# Altium PCB nrf_400708.PcbDoc (part 4 of 6)
Units mm, origin at the board's own origin, x right, y up, seen from the top; angles counter-clockwise.
Board outline 117 x 63.5 mm, 4 copper layers (Top Layer, Mid-Layer 1, Mid-Layer 2, Bottom Layer), stack 1.556 mm thick; 226 components, 168 nets, 912 pads, 2002 vias.
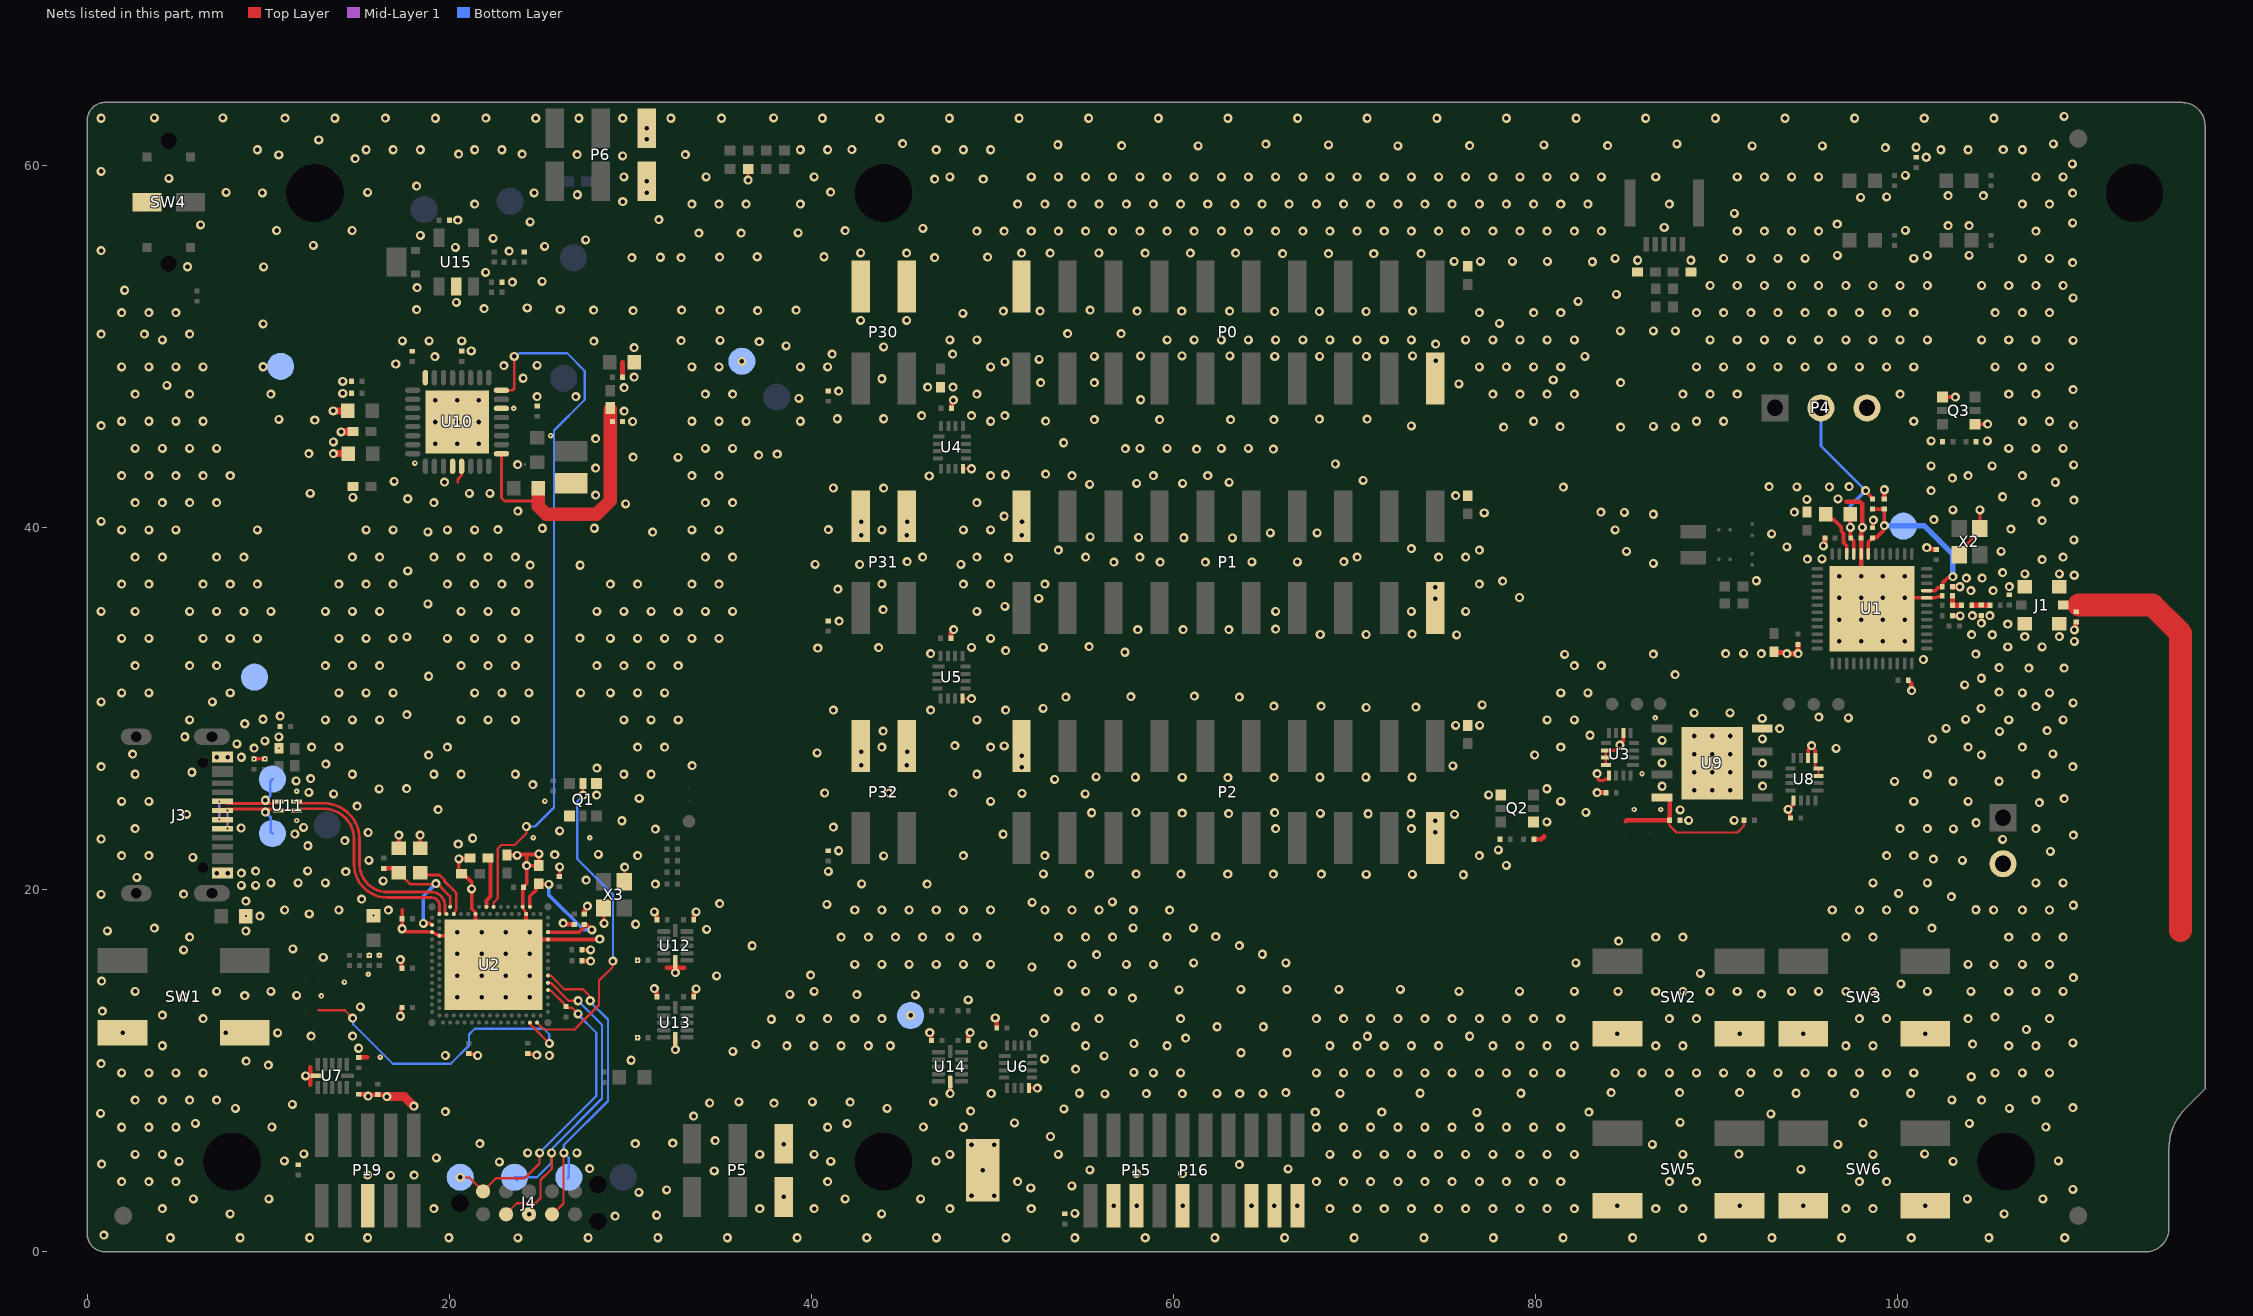
[diagram p4: the nets of this part, all layers, seen from the top]

## Via types
v1: diameter 0.5, hole 0.25, Top Layer to Bottom Layer, tented both sides, 1905 vias
v2: diameter 0.3, hole 0.1, Top Layer to Mid-Layer 1, tented top, 77 vias
v3: diameter 0.3, hole 0.1, Top Layer to Mid-Layer 1, tented both sides, 20 vias

## Nets (pads, with @x,y where several pads share a name; then routed paths per layer and width w, separated by ;. In a path a pad name is that pad's centre, name@x,y a point inside that pad or via, vN(x,y) a via of type N, cw(c..) or ccw(c..) an arc to the next point about the centre after c; other vN are vias at no path point) (continued)
GND: (continued)
  Top Layer w0.25: v1(12.075,9.725) U7.6@12.7,9.725 ; 12.34,9.244 12.34,10.2 ; C14.2@15.004,8.707 15.014,8.697 15.36,8.697 15.457,8.6 v1(15.525,8.6) 15.593,8.6 15.675,8.682 16.054,8.682 R18.1@16.064,8.692 16.074,8.682 16.391,8.682 16.493,8.58 v1(16.56,8.58) ; C53.1@15.004,10.744 15.468,10.744 ; v1(26.299,18.167) 26.367,18.167 26.433,18.101 26.899,18.101 C36.2@26.909,18.091 ; v1(31.346,14.539) 31.346,14.471 31.471,14.346 31.471,14.114 C76.2@31.481,14.104 ; v1(31.346,18.789) 31.346,18.721 31.471,18.596 31.471,18.364 C74.2@31.481,18.354 ; 32.025,15.69 32.981,15.69 ; v1(32.5,11.175) U13.6@32.5,11.8 ; v1(32.5,15.425) U12.6@32.5,16.05 ; C77.2@33.518,14.094 33.528,14.104 33.528,14.341 33.653,14.466 v1(33.653,14.533) ; C75.2@33.518,18.354 33.528,18.364 33.528,18.596 33.653,18.721 v1(33.653,18.789) ; v1(46.555,12.114) 46.555,12.046 46.644,11.957 46.644,11.689 C78.2@46.654,11.679 ; v1(47.675,8.75) U14.6@47.675,9.375 ; C15.2@47.718,33.903 47.728,33.913 47.728,34.168 47.868,34.307 v1(47.868,34.375) ; C10.2@47.752,46.607 47.762,46.617 47.762,46.894 47.856,46.989 v1(47.856,47.056) ; C79.2@48.68,11.679 48.69,11.689 48.69,11.956 48.78,12.046 v1(48.78,12.114) ; v1(50.172,12.931) 50.172,12.864 50.245,12.79 50.245,12.379 C49.2@50.255,12.369 ; v1@95.915,39.068 v1@95.915,39.073 ; 97.195,41.453 97.938,41.453 98.074,41.317 v1(98.074,40.022) 98.074,39.954 98.015,39.895 98.015,39.449 C1.1@98.005,39.439 U1.44@98.005,38.555 v1(98.005,37.33) ; C2.1@99.294,41.602 v1(99.294,42.104) ; C8.2@100.61,31.575 100.61,31.56 100.62,31.55 100.624,31.55 100.77,31.404 100.77,31.027 v1(100.792,31.005) ; v1(101.63,38.904) 101.698,38.904 101.784,38.818 102.154,38.818 C4.2@102.164,38.808 ; C60.2@103.058,35.149 103.063,35.144 103.466,35.144 v1(103.471,35.139) ; v1(109.789,34.36) 109.789,34.427 109.855,34.493 109.855,34.785 109.865,34.795 C38.1@109.88,34.795
  Top Layer w0.254: X3.4@28.531,18.994 X3.4@28.534,18.99 ; X3.2@29.677,20.448 X3.2@29.681,20.444
  Top Layer w0.27: C25.1@29.59,48.321 29.59,49.147 ; R10.2@79.925,22.798 80.344,22.798 80.488,22.942 ; v1(83.425,25.375) 83.429,25.371 83.908,25.371 C65.2@83.908,25.365 ; C19.1@85.652,54.123 C19.1@85.654,54.124 ; v1@85.654,54.779 v1(85.656,54.781) ; v1(95.915,39.006) 95.915,39.068 96,39.153 C11.2@96,39.439
  Top Layer w0.3: C41.1@93.186,33.155 93.23,33.112 93.798,33.112 93.855,33.055 v1(93.909,33.055) v1(94.53,33.055) 94.518,33.067 C7.2@94.518,33.564 ; C5.1@103.084,36.75 103.454,36.75 v1(103.459,36.745)
  Top Layer w0.4: v1(13.6,46.456) 14.401,46.456 C26.1@14.404,46.459 ; v1@13.61,44.1 C54.2@14.425,44.1 ; v1(14.032,45.304) 14.037,45.308 14.679,45.308 C23.1@14.684,45.313 ; v1(90.775,28.5) U9.9@90.975,28.5 ; U9.4@92.545,28.905 U9.4@92.547,28.903 ; v1@92.547,28.344 v1(92.549,28.341)
  Top Layer w0.5: v1(16.56,8.58) 17.53,8.58 v1(18.055,8.055)
  other v1: 4.604,0.78 8.451,0.78 12.298,0.78 15.498,0.78 19.991,0.78 23.8,0.775 27.685,0.78 31.532,0.78 35.379,0.78 39.225,0.78 43.072,0.78 46.919,0.78 50.766,0.78 54.575,0.78 58.459,0.78 62.306,0.78 66.153,0.78 70,0.78 73.847,0.78 77.693,0.78 81.54,0.78 85.387,0.78 89.234,0.78 93.081,0.78 96.927,0.78 100.774,0.78 105.063,0.78 109.254,0.78 0.929,0.925 29.175,1.975 31.471,2.025 24.418,2.074 7.9,2.1 43.9,2.1 105.9,2.1 54.575,2.125 4.162,2.387 19.162,2.387 37.162,2.387 40.162,2.387 47.662,2.387 52.162,2.387 68.662,2.387 70.162,2.387 71.662,2.387 73.162,2.387 74.662,2.387 76.162,2.387 77.662,2.387 79.162,2.387 80.662,2.387 82.162,2.387 86.662,2.387 88.162,2.387 97.162,2.387 98.662,2.387 56.708,2.553 57.978,2.553 60.518,2.553 64.328,2.55 65.598,2.55 66.868,2.55 84.543,2.561 91.293,2.561 94.804,2.561 101.554,2.561 5.875,2.925 10.046,2.925 41.875,2.925 46.046,2.925 103.875,2.925 108.046,2.925 38.5,3.04 48.86,3.097 50.124,3.097 30.488,3.282 32.023,3.426 109.704,3.458 52.134,3.531 54.4,3.65 1.912,3.887 3.412,3.887 4.912,3.887 40.912,3.887 51.412,3.887 67.912,3.887 69.412,3.887 70.912,3.887 72.412,3.887 73.912,3.887 75.412,3.887 76.912,3.887 78.412,3.887 79.912,3.887 81.412,3.887 87.412,3.887 88.912,3.887 97.912,3.887 99.412,3.887 16.766,4.224 15.498,4.244 18.07,4.246 57.978,4.32 60.525,4.32 34.65,4.473 49.475,4.5 55.403,4.531 94.677,4.558 27.763,4.596 66.356,4.589 0.804,4.85 63.655,4.826 22.784,4.973 5.084,5 41.084,5 103.084,5 10.905,5.025 46.905,5.025 108.905,5.025 19.296,5.197 2.662,5.387 4.162,5.387 37.162,5.387 40.162,5.387 47.662,5.387 53.662,5.387 68.662,5.387 70.162,5.387 71.662,5.387 73.162,5.387 74.662,5.387 76.162,5.387 77.662,5.387 79.162,5.387 80.662,5.387 82.162,5.387 88.162,5.387 91.25,5.4 98.662,5.387 11.982,5.412 101.518,5.411 24.343,5.475 27.058,5.475 48.86,5.922 50.125,5.922 86.474,5.941 96.721,5.941 38.5,5.945 21.707,5.978 30.285,5.979 32.356,6.013 34.7,6.15 53.225,6.375 1.912,6.887 3.412,6.887 4.912,6.887 10.208,6.9 40.912,6.887 46.208,6.9 48.412,6.887 67.912,6.887 69.412,6.887 70.912,6.887 72.412,6.887 73.912,6.887 75.412,6.887 76.912,6.887 78.412,6.887 79.912,6.887 81.412,6.887 108.208,6.9 5.99,7.1 41.99,7.1 103.99,7.1 51.236,7.125 98.114,7.125 88.004,7.15 33.514,7.5 93.025,7.627 0.75,7.65 67.85,7.72 76.775,7.706 71.525,7.722 82.963,7.722 19.793,7.752 48.81,7.772 53.969,7.9 8.2,7.925 44.2,7.925 106.2,7.925 109.704,7.975 11.343,8.151 34.393,8.225 37.95,8.213 42.149,8.275 36.015,8.282 40.066,8.282 46.754,8.282 2.662,8.387 4.162,8.387 5.662,8.387 7.162,8.387 103.025,8.4 104.662,8.387 107.662,8.387 56.225,8.725 49.951,8.75 58.517,8.747 60.515,8.747 62.419,8.756 63.68,8.747 64.959,8.76 69.225,8.756 54.822,8.763 73.64,8.763 79.213,8.763 94.409,8.763 97.65,8.763 100.735,8.763 66.229,8.798 84.193,8.798 87.974,8.798 91.293,8.798 104.09,9.675 1.912,9.887 3.412,9.887 4.912,9.887 6.412,9.887 58.912,9.887 60.412,9.887 67.912,9.887 69.412,9.887 70.912,9.887 72.412,9.887 73.912,9.887 75.412,9.887 76.912,9.887 78.412,9.887 79.912,9.887 81.412,9.887 84.412,9.887 85.912,9.887 87.412,9.887 88.912,9.887 90.412,9.887 91.912,9.887 93.412,9.887 94.912,9.887 96.412,9.887 97.912,9.887 99.412,9.887 100.912,9.887 105.412,9.887 106.912,9.887 108.412,9.887 57.825,9.915 54.61,10.1 10.015,10.313 0.78,10.4 8.794,10.535 30.058,10.588 52.9,10.666 56.185,10.825 19.8,10.85 25.54,10.85 63.748,11.002 66.297,11.002 35.675,11.075 15.004,11.25 4.162,11.387 38.662,11.387 40.162,11.387 41.662,11.387 43.162,11.387 44.375,11.389 55.162,11.387 59.662,11.387 68.662,11.387 70.162,11.387 71.662,11.387 73.162,11.387 74.662,11.387 77.662,11.387 79.162,11.387 80.662,11.387 82.162,11.387 86.662,11.387 88.162,11.387 97.162,11.387 98.662,11.387 106.162,11.387 107.662,11.387 49.504,11.435 36.95,11.458 104.16,11.475 57.825,11.513 109.704,11.55 60.688,11.814 12.375,11.925 14.675,11.925 70.725,11.913 76.377,11.913 84.543,12.058 91.293,12.058 94.804,12.061 101.554,12.061 52.282,12.088 1.963,12.097 7.65,12.097 10.529,12.102 107.135,12.286 54.61,12.438 62.432,12.438 64.982,12.438 37.8,12.851 6.412,12.887 39.412,12.887 40.912,12.887 42.412,12.887 43.912,12.887 52.912,12.887 55.912,12.887 60.412,12.887 67.912,12.887 69.412,12.887 70.912,12.887 72.412,12.887 73.912,12.887 75.412,12.887 76.912,12.887 78.412,12.887 79.912,12.887 81.412,12.887 87.412,12.887 88.912,12.887 97.912,12.887 99.412,12.887 103.912,12.887 108.412,12.887 105.406,12.975 4.162,13.078 45.5,13.064 0.852,13.3 15.1,13.535 48.68,13.928 57.748,14.025 20.46,14.064 21.794,14.064 23.127,14.064 24.46,14.064 5.335,14.1 8.713,14.152 11.579,14.167 38.825,14.221 42.533,14.208 45.762,14.2 92.496,14.239 2.662,14.387 7.162,14.387 10.162,14.387 40.162,14.387 53.662,14.387 55.162,14.387 56.662,14.387 75.791,14.393 79.134,14.393 82.162,14.387 84.575,14.393 86.662,14.387 88.162,14.387 89.662,14.387 91.162,14.387 94.162,14.387 95.662,14.387 97.162,14.387 98.662,14.387 101.662,14.387 104.068,14.393 106.162,14.387 107.662,14.387 109.162,14.387 60.325,14.475 63.741,14.5 66.288,14.5 69.15,14.5 72.55,14.5 100.205,14.806 0.804,14.954 109.729,15.15 20.46,15.264 21.794,15.264 23.127,15.264 24.46,15.264 34.775,15.247 39.977,15.285 89.122,15.387 52.199,15.738 42.412,15.887 43.912,15.887 45.412,15.887 46.912,15.887 48.412,15.887 49.912,15.887 54.412,15.887 57.412,15.887 58.912,15.887 103.912,15.887 105.35,15.887 106.912,15.887 108.412,15.887 61.126,15.963 66.229,15.963 82.25,15.963 13.05,16.275 55.777,16.419 64.925,16.443 20.46,16.464 21.794,16.464 23.127,16.464 24.46,16.464 5.335,16.687 11.375,16.744 36.744,16.913 63.655,16.924 84.613,17.172 5.662,17.387 41.662,17.387 43.162,17.387 44.662,17.387 46.162,17.387 47.662,17.387 49.162,17.387 53.662,17.387 55.162,17.387 56.662,17.387 59.662,17.387 86.662,17.387 88.162,17.387 97.162,17.387 98.662,17.387 106.162,17.387 107.662,17.387 109.162,17.387 62.354,17.411 20.46,17.664 21.794,17.664 23.127,17.664 24.46,17.664 8.771,17.727 1.125,17.732 34.233,17.812 3.725,17.886 57.788,17.894 61.115,17.903 101.913,17.887 30.306,18.101 9.548,18.552 12.275,18.672 10.912,18.887 13.912,18.887 16.65,18.879 42.412,18.887 43.912,18.887 45.412,18.887 46.912,18.887 48.412,18.887 49.912,18.887 52.912,18.887 54.412,18.887 55.912,18.887 57.8,18.875 59.8,18.875 96.412,18.887 97.912,18.887 99.412,18.887 100.912,18.887 105.324,18.887 106.912,18.887 108.412,18.887 104.351,18.9 109.729,19.15 40.875,19.199 34.95,19.235 52.205,19.313 56.649,19.339 8.775,19.375 15.169,19.491 102.993,19.625 0.78,19.754 5.335,19.769 100.076,19.8 8.529,20.25 9.318,20.25 31.398,20.313 46.404,20.317 42.786,20.325 10.162,20.387 11.662,20.387 13.162,20.387 98.662,20.387 101.662,20.387 107.662,20.387 109.162,20.387 16.361,20.49 27.575,20.535 2.755,20.685 70.667,20.85 73.213,20.85 76.033,20.835 55.389,20.869 57.95,20.875 60.427,20.875 63.015,20.875 65.534,20.875 68.188,20.875 52.829,20.88 7.168,20.921 7.779,20.925 8.529,20.925 14.292,21.012 40.95,21.018 9.318,21.041 12.19,21.05 78.405,21.35 15.575,21.625 103.604,21.625 101.998,21.7 5.845,21.797 1.912,21.887 3.412,21.887 30.412,21.887 44.004,21.881 48.412,21.887 52.912,21.887 76.912,21.887 99.412,21.887 100.912,21.887 25.837,21.948 28.251,21.959 108.457,22.13 41.525,22.16 77.967,22.21 12.196,22.436 20.506,22.531 14.242,22.718 105.817,22.792 0.78,22.81 21.3,22.85 109.729,23.025 11.479,23.085 50.602,23.071 15.525,23.169 74.484,23.177 26.11,23.254 31.398,23.354 103.107,23.367 2.662,23.387 65.662,23.387 73.162,23.387 100.162,23.387 101.662,23.387 107.662,23.387 8.517,23.417 11.966,23.455 41.225,23.461 104.354,23.708 80.648,23.76 29.542,23.819 74.484,23.828 88.472,23.835 90.988,23.835 5.5,24.175 75.542,24.165 70.775,24.203 73.129,24.203 63.07,24.211 68.139,24.223 60.503,24.244 55.494,24.26 57.937,24.274 65.601,24.265 82.805,24.286 19.394,24.429 88.004,24.415 14.925,24.625 107.854,24.825 1.912,24.887 3.412,24.887 49.912,24.887 81.412,24.887 100.912,24.887 103.912,24.887 109.224,25.035 30.506,25.048 28.15,25.234 77.425,25.25 55.14,25.297 13.625,25.3 47.839,25.343 51.65,25.332 40.75,25.35 44.3,25.35 12.26,25.387 88.775,25.5 89.775,25.5 90.775,25.5 16.13,25.583 17.651,25.59 80.65,25.585 87.013,25.724 92.564,25.734 24.634,25.81 99.85,25.996 103.084,26 105.625,26 11.55,26.025 53.45,26.098 12.347,26.15 63.02,26.205 65.582,26.198 57.911,26.22 60.503,26.213 68.103,26.22 70.644,26.22 73.2,26.22 55.743,26.242 2.662,26.387 14.662,26.387 19.162,26.387 20.662,26.387 23.662,26.387 29.662,26.387 31.162,26.387 49.162,26.387 101.662,26.387 107.662,26.387 5.796,26.498 88.775,26.5 89.775,26.5 90.775,26.5 28.164,26.72 51.649,26.785 0.78,26.804 109.71,26.805 33.425,26.865 75.45,26.852 42.759,26.888 45.284,26.885 13.197,26.95 87.013,27.009 92.556,27 7.171,27.325 7.779,27.325 8.529,27.325 51.649,27.41 18.869,27.441 79.969,27.45 104.646,27.45 2.517,27.497 88.775,27.5 89.775,27.5 90.775,27.5 108.599,27.516 40.329,27.561 42.759,27.622 45.299,27.622 96.624,27.812 9.225,27.825 12.412,27.887 13.912,27.887 19.912,27.887 30.412,27.887 31.912,27.887 43.912,27.887 49.912,27.887 81.412,27.887 103.912,27.887 106.912,27.887 50.668,27.95 47.946,27.974 8.283,28.065 9.824,28.225 87.01,28.26 101.946,28.341 5.4,28.459 10.596,28.452 88.775,28.5 89.775,28.5 83.028,28.54 105.65,28.75 43.975,28.775 108.279,28.8 93.503,28.905 102.699,28.924 75.605,29.083 76.925,29.083 8.713,29.175 5.662,29.387 13.162,29.387 14.662,29.387 16.162,29.387 20.662,29.387 22.162,29.387 23.662,29.387 29.662,29.387 31.162,29.387 32.662,29.387 49.162,29.387 80.662,29.387 82.162,29.387 106.162,29.387 109.162,29.387 9.721,29.425 103.78,29.414 92.545,29.475 97.305,29.502 95.667,29.542 10.662,29.6 17.664,29.675 88.775,29.78 90.762,29.78 41.233,29.935 46.6,29.925 50.748,29.935 104.635,30.02 52.812,30.025 70.662,30.073 73.404,30.1 107.658,30.128 65.57,30.15 68.178,30.15 77.072,30.222 109.718,30.329 0.78,30.387 6.919,30.387 54.076,30.647 63.655,30.645 57.663,30.676 61.175,30.699 1.912,30.887 3.412,30.887 7.912,30.887 13.912,30.887 15.412,30.887 16.912,30.887 21.412,30.887 22.912,30.887 24.412,30.887 27.262,30.887 28.912,30.887 30.412,30.887 31.912,30.887 81.412,30.887 82.912,30.887 106.912,30.887 108.412,30.887 105.625,30.925 103.725,31.325 104.653,31.689 18.869,31.8 87.73,31.896 107.279,32.248 109.224,32.252 105.625,32.275 2.662,32.387 5.662,32.387 7.162,32.387 13.162,32.387 14.662,32.387 16.162,32.387 20.662,32.387 22.162,32.387 23.662,32.387 28.162,32.387 29.662,32.387 31.162,32.387 32.662,32.387 82.162,32.387 83.662,32.387 101.45,32.725 81.625,33.005 86.525,33.025 104.344,33.025 46.6,33.05 90.525,33.05 91.513,33.063 92.5,33.05 57.329,33.125 50.748,33.216 40.365,33.355 43.73,33.383 48.86,33.399 52.823,33.399 106.107,33.42 108.005,33.42 55.353,33.438 96.805,33.73 98.005,33.73 99.205,33.73 100.405,33.73 109.788,33.73 1.912,33.887 3.412,33.887 6.412,33.887 7.912,33.887 9.412,33.887 13.912,33.887 15.412,33.887 16.912,33.887 19.912,33.887 21.412,33.887 22.912,33.887 24.412,33.887 27.223,33.903 28.912,33.887 30.412,33.887 31.912,33.887 33.412,33.887 34.912,33.887 49.912,33.887 17.664,33.975 107.045,33.989 108.955,33.989 75.657,34.081 68.125,34.106 70.662,34.106 104.115,34.105 105.25,34.093 73.204,34.127 58.043,34.375 60.552,34.375 63.079,34.375 65.657,34.406 106.107,34.685 104.646,34.736 41.55,34.85 96.805,34.93 98.005,34.93 99.205,34.93 100.405,34.93 104.149,35.154 105.121,35.154 0.78,35.387 2.662,35.387 5.662,35.387 7.162,35.387 8.662,35.387 10.162,35.387 13.162,35.387 14.662,35.387 16.162,35.387 20.662,35.387 22.162,35.387 23.662,35.387 28.162,35.387 29.662,35.387 31.162,35.387 32.662,35.387 34.162,35.387 35.662,35.387 49.162,35.387 65.662,35.387 73.162,35.387 76.162,35.387 43.975,35.478 50.707,35.655 18.832,35.798 74.475,36.074 52.575,36.1 96.805,36.13 98.005,36.13 99.205,36.13 100.405,36.13 79.134,36.15 104.068,36.525 105.3,36.525 41.478,36.617 74.475,36.725 106.2,36.755 1.912,36.887 3.412,36.887 6.412,36.887 7.912,36.887 9.412,36.887 13.912,36.887 15.412,36.887 16.912,36.887 19.912,36.887 21.412,36.887 22.912,36.887 24.412,36.887 28.912,36.887 30.412,36.887 33.412,36.887 34.912,36.887 43.912,36.887 48.412,36.887 49.912,36.887 52.912,36.887 76.912,36.887 78.2,37.052 92.225,37.075 103.825,37.225 104.695,37.225 96.805,37.33 99.205,37.33 100.405,37.33 109.78,37.38 107.055,37.456 108.955,37.456 105.826,37.524 17.717,37.622 24.479,37.936 27.24,37.931 40.225,37.975 42.681,37.973 48.278,37.975 86.525,38.04 56.729,38.107 59.275,38.1 61.775,38.1 64.352,38.115 66.864,38.115 45.299,38.127 69.429,38.127 108.005,38.238 95.041,38.273 95.845,38.28 50.905,38.347 2.662,38.387 4.162,38.387 7.162,38.387 8.662,38.387 14.662,38.387 16.162,38.387 19.162,38.387 20.662,38.387 22.162,38.387 23.662,38.387 34.162,38.387 35.662,38.387 46.162,38.387 49.162,38.387 55.162,38.387 58.162,38.387 70.162,38.387 74.662,38.387 76.162,38.387 109.162,38.387 85.044,38.7 105.741,38.7 53.656,38.764 76.917,38.764 73.162,38.846 93.9,38.944 109.76,39.33 60.594,39.451 63.274,39.45 55.417,39.494 58.092,39.476 42.759,39.588 45.284,39.585 51.629,39.585 93.057,39.665 65.374,39.716 67.95,39.721 31.243,39.759 18.832,39.777 1.912,39.887 3.412,39.887 4.912,39.887 9.412,39.887 15.412,39.887 16.912,39.887 19.912,39.887 21.412,39.887 22.692,39.9 33.412,39.887 34.912,39.887 40.951,39.9 43.912,39.887 48.412,39.887 49.912,39.887 84.412,39.887 106.277,39.93 25.15,39.975 28.025,39.975 42.759,40.322 45.299,40.322 51.65,40.325 0.78,40.355 108.005,40.403 102.025,40.45 50.662,40.64 86.525,40.75 77.187,40.83 83.625,40.867 84.929,40.855 94.317,40.867 23.803,40.927 103.073,40.987 29.75,41.325 2.662,41.387 4.162,41.387 5.662,41.387 7.162,41.387 19.162,41.387 34.162,41.387 35.662,41.387 49.162,41.387 107.662,41.387 109.76,41.53 95.005,41.571 96.728,41.596 17.717,41.605 14.684,41.686 105.826,41.717 75.605,41.781 28.1,41.807 12.33,41.907 21.125,41.9 22.25,41.9 101.876,42.05 41.225,42.2 44.004,42.193 81.558,42.249 94.459,42.258 96.25,42.255 92.925,42.275 97.341,42.278 55.389,42.404 57.985,42.45 60.526,42.45 63.086,42.505 108.736,42.517 19.748,42.521 16.963,42.57 70.5,42.615 103.05,42.75 46.525,42.863 1.912,42.887 3.412,42.887 4.912,42.887 6.412,42.887 7.912,42.887 33.412,42.887 34.912,42.887 49.912,42.887 54.412,42.887 58.912,42.887 61.912,42.887 103.912,42.887 106.912,42.887 50.748,42.931 52.95,42.961 28.1,43.3 101.875,43.425 105.236,43.42 109.739,43.48 23.792,43.496 68.959,43.525 30.17,43.906 32.653,43.895 37.1,44.02 38.128,44.067 12.258,44.1 13.61,44.096 61.3,44.347 65.534,44.347 57.363,44.371 2.662,44.387 4.162,44.387 5.662,44.387 7.162,44.387 34.162,44.387 35.662,44.387 58.162,44.387 59.662,44.387 62.662,44.387 64.162,44.387 106.162,44.387 107.662,44.387 109.162,44.387 19.242,44.646 20.442,44.646 21.642,44.646 53.95,44.7 13.61,44.746 101.875,44.8 104.986,44.8 28.1,44.927 78.252,45.563 84.725,45.563 81.375,45.592 87.75,45.575 86.525,45.6 73.162,45.634 0.78,45.647 109.739,45.68 104.993,45.725 19.242,45.846 20.442,45.846 21.642,45.846 1.912,45.887 3.412,45.887 4.912,45.887 6.412,45.887 30.139,45.874 33.412,45.887 34.912,45.887 36.412,45.887 39.412,45.887 49.912,45.887 52.95,45.889 79.912,45.887 88.912,45.887 90.412,45.887 100.912,45.887 106.912,45.887 108.412,45.887 12.58,45.946 10.6,45.988 55.65,45.975 59.248,45.975 63.175,45.975 65.57,45.975 68.075,46 70.719,46 41.45,46.026 44.004,46.026 46.1,46.2 48.86,46.2 50.707,46.201 29.675,46.45 19.242,47.046 20.442,47.046 21.642,47.046 58.2,47.075 39.328,47.15 24.867,47.246 27,47.25 2.662,47.387 5.662,47.387 10.162,47.387 34.162,47.387 35.662,47.387 49.162,47.387 77.662,47.387 79.162,47.387 80.662,47.387 82.162,47.387 88.162,47.387 89.662,47.387 91.162,47.387 100.162,47.387 106.162,47.387 107.662,47.387 14.125,47.425 41.525,47.549 109.718,47.63 29.675,47.75 46.439,47.769 47.839,47.769 4.412,47.871 75.779,47.949 52.677,48.025 55.65,48.025 84.725,48.025 14.125,48.091 80.998,48.175 43.906,48.234 24.087,48.264 30.225,48.329 1.912,48.887 3.412,48.887 4.912,48.887 6.412,48.887 33.412,48.887 34.912,48.887 39.412,48.887 40.912,48.887 49.912,48.887 76.912,48.887 78.412,48.887 79.912,48.887 81.412,48.887 88.912,48.887 90.412,48.887 91.912,48.887 93.412,48.887 94.912,48.887 96.412,48.887 97.912,48.887 99.412,48.887 100.912,48.887 105.412,48.887 106.912,48.887 108.412,48.887 9.725,48.898 23.025,48.955 24.867,48.975 17.055,49.05 50.707,49.164 36.174,49.2 74.504,49.225 52.6,49.308 19.217,49.455 55.65,49.475 65.613,49.475 68.088,49.475 70.675,49.475 82.75,49.475 58.2,49.5 60.488,49.5 63.138,49.5 73.231,49.5 41.157,49.598 47.819,49.6 21.225,49.775 30.225,49.949 44.004,49.997 38.625,50.048 74.5,50.15 37.135,50.287 28.001,50.31 17.425,50.332 18.9,50.325 20.7,50.325 32.824,50.343 34.975,50.35 109.713,50.35 4.162,50.387 47.662,50.387 49.162,50.387 59.662,50.387 61.162,50.387 62.662,50.387 64.162,50.387 65.662,50.387 67.162,50.387 68.662,50.387 70.162,50.387 71.662,50.387 73.162,50.387 76.162,50.387 77.662,50.387 79.162,50.387 80.662,50.387 82.162,50.387 89.662,50.387 91.162,50.387 92.662,50.387 94.162,50.387 95.662,50.387 97.162,50.387 98.662,50.387 100.162,50.387 101.662,50.387 104.662,50.387 106.162,50.387 107.662,50.387 0.775,50.7 3.17,50.7 5.662,50.7 54.164,50.725 57.125,50.728 84.712,50.875 86.525,50.875 87.75,50.875 9.725,51.263 78.025,51.29 42.734,51.461 45.274,51.461 48.379,51.85 1.912,51.887 3.412,51.887 4.912,51.887 76.912,51.887 79.912,51.887 81.412,51.887 88.912,51.887 90.412,51.887 91.912,51.887 93.412,51.887 94.912,51.887 96.412,51.887 97.912,51.887 99.412,51.887 100.912,51.887 105.412,51.887 106.912,51.887 108.412,51.887 65.6,51.95 68.075,51.95 70.662,51.95 50.625,51.975 52.65,51.975 58.012,51.975 60.475,51.975 63.125,51.975 73.231,51.975 30.17,52.001 37.047,52.001 27.984,52.025 32.85,52.025 34.975,52.025 39.175,52.025 55.417,52.025 18.209,52.048 26.142,52.048 21.932,52.104 24.319,52.152 20.4,52.45 82.369,52.504 109.713,52.7 84.481,52.894 2.075,53.125 18.231,53.274 89.662,53.387 91.162,53.387 92.662,53.387 94.162,53.387 95.662,53.387 97.162,53.387 98.662,53.387 100.162,53.387 101.662,53.387 104.662,53.387 106.162,53.387 107.662,53.387 109.162,53.387 23.499,53.575 25.138,53.611 22.014,54.114 5.55,54.422 9.75,54.41 109.692,54.65 83.162,54.698 75.525,54.72 76.975,54.72 78.741,54.72 80.677,54.72 88.604,54.781 84.412,54.887 90.412,54.887 91.912,54.887 93.412,54.887 94.912,54.887 100.912,54.887 106.912,54.887 108.412,54.887 30.098,54.931 32.823,54.925 46.82,54.925 31.675,54.947 34.95,54.954 49.75,54.954 37.025,54.975 40.711,54.975 96.696,55.049 101.664,55.049 103.973,55.049 66.05,55.152 68.582,55.152 71.082,55.152 73.7,55.152 42.734,55.184 45.275,55.175 51.629,55.179 53.2,55.175 55.9,55.182 58.45,55.175 60.95,55.175 63.45,55.175 23.317,55.289 0.775,55.312 20.348,55.488 25.278,55.551 12.5,55.6 27.542,55.902 22.431,55.988 18.415,56.153 33.803,56.277 36.134,56.274 39.282,56.299 49.162,56.387 50.662,56.387 52.162,56.387 53.662,56.387 55.162,56.387 56.662,56.387 58.162,56.387 59.662,56.387 61.162,56.387 62.662,56.387 64.162,56.387 65.662,56.387 67.162,56.387 68.662,56.387 70.162,56.387 71.662,56.387 73.162,56.387 74.662,56.387 76.162,56.387 77.662,56.387 79.162,56.387 80.662,56.387 82.162,56.387 83.662,56.387 91.162,56.387 92.662,56.387 94.162,56.387 95.662,56.387 107.662,56.387 10.475,56.425 14.646,56.425 41.879,56.417 100.454,56.435 46.169,56.536 87.129,56.595 102.811,56.698 103.973,56.698 6.271,56.738 96.686,56.777 109.692,56.85 24.479,56.9 20.478,57 31.595,57.025 91.006,57.368 21.412,57.887 33.412,57.887 34.912,57.887 36.412,57.887 39.412,57.887 51.412,57.887 52.912,57.887 54.412,57.887 55.912,57.887 57.412,57.887 58.912,57.887 60.412,57.887 61.912,57.887 63.412,57.887 64.912,57.887 66.412,57.887 67.912,57.887 69.412,57.887 70.912,57.887 72.412,57.887 73.912,57.887 75.412,57.887 76.912,57.887 78.412,57.887 79.912,57.887 81.412,57.887 82.912,57.887 87.412,57.887 106.912,57.887 108.412,57.887 29.595,58.026 97.976,58.25 99.417,58.277 102.813,58.349 104.756,58.349 27.084,58.4 109.692,58.492 9.684,58.5 24.7,58.5 30.917,58.513 7.684,58.525 15.505,58.525 41.077,58.55 18.209,58.871 30.912,59.141 46.825,59.268 49.51,59.268 4.521,59.305 29.662,59.387 34.2,59.387 40.162,59.387 47.662,59.387 52.162,59.387 53.662,59.387 55.162,59.387 56.662,59.387 58.162,59.387 59.662,59.387 61.162,59.387 62.662,59.387 64.162,59.387 65.662,59.387 67.162,59.387 68.662,59.387 70.162,59.387 71.662,59.387 73.162,59.387 74.662,59.387 76.162,59.387 77.662,59.387 79.162,59.387 80.662,59.387 82.162,59.387 83.662,59.387 86.662,59.387 91.162,59.387 92.662,59.387 94.162,59.387 95.662,59.387 107.662,59.387 109.162,59.387 100.445,59.466 0.775,59.693 109.671,60.1 14.808,60.4 101.603,60.47 29.59,60.542 10.59,60.6 27.072,60.615 33.05,60.615 20.525,60.65 24.036,60.65 9.412,60.887 15.412,60.887 16.912,60.887 18.412,60.887 21.412,60.887 22.912,60.887 39.412,60.887 40.912,60.887 42.25,60.9 46.912,60.887 48.412,60.887 49.912,60.887 102.412,60.887 103.912,60.887 105.856,60.899 106.912,60.887 99.35,61 101.039,61.025 61.375,61.095 72.412,61.098 76.377,61.11 84,61.11 91.978,61.098 95.865,61.098 57.15,61.113 53.633,61.162 68.582,61.15 80.475,61.15 65.125,61.196 87.826,61.21 108.625,61.21 45.05,61.225 12.8,61.425 30.917,61.468 30.912,62.071 0.78,62.625 10.936,62.629 13.695,62.625 16.482,62.629 19.241,62.625 22.028,62.629 24.787,62.625 27.175,62.625 29.595,62.625 32.251,62.625 35.05,62.625 40.625,62.625 43.792,62.625 47.638,62.625 51.485,62.625 55.332,62.625 59.179,62.625 63.026,62.625 66.872,62.625 70.719,62.625 74.566,62.625 78.413,62.625 82.259,62.625 86.106,62.625 89.953,62.625 93.8,62.625 97.647,62.625 101.493,62.625 105.34,62.625 3.719,62.65 7.501,62.65 37.927,62.65 109.222,62.727
  other v2: 30.415,11.84 30.415,16.1 15.601,16.385 16.146,16.386 15.826,18.576 85.464,24.44 86.942,24.44 85.902,26.425 86.635,29.502
  other v3: 16.2,10.76 12.947,14.144 14.215,14.907 15.531,15.336 8.775,18.552 24.655,22.884 27.77,22.876 11.579,23.833 25.297,24.901 11.579,25.449 10.6,27.825 18.109,43.578 25.61,45.096 23.574,46.596
LED_PWR_CTRL: U2.A17 U10.8 | length 39.3
  Top Layer w0.125: U2.A17@22.46,19.064 22.46,19.287 22.692,19.519 22.692,22.288 22.88,22.475 23.63,22.475 24.275,23.12 v1(24.275,23.5)
  Top Layer w0.15: U10.8@22.892,47.596 23.49,47.596 23.604,47.71 23.604,49.471 v1(23.6,49.475)
  Bottom Layer w0.125: v1(23.6,49.475) 23.696,49.475 23.861,49.64 26.523,49.64 27.5,48.663 27.5,47.075 25.8,45.375 25.8,24.55 24.75,23.5 v1(24.275,23.5)
NetC6_2: C6.2 L2.2 L3.1 | length 0.9
  Top Layer w0.27: L2.2@103.058,35.73 C6.2@103.058,36.25
  Top Layer w0.3: L2.2@103.13,35.73 L3.1@103.5,35.73
NetC9_2: C9.2 L3.2 L4.1 | length 0.9
  Top Layer w0.3: L3.2@104.149,35.73 C9.2@104.635,35.73 L4.1@105.065,35.73
NetC21_1: C21.1 R39.2 SB9.2 SB10.2 U9.8 | length 9.1
  Top Layer w0.125: C21.1@87.422,23.842 87.422,23.553 87.801,23.174 91.174,23.174 91.537,23.537 R39.2@91.537,23.835
  Top Layer w0.25: 84.997,23.794 85.045,23.842 SB10.2@86.347,23.842 C21.1@87.422,23.842 87.422,24.995 87.322,25.095 U9.8@87.005,25.095
NetC27_2: C27.2 C57.2 FB3.1 L8.1 U10.1 | length 15.1
  Top Layer w0.15: U10.1@22.892,44.096 22.892,41.657 23.068,41.481 24.924,41.481
  Top Layer w0.75: C27.2@24.924,42.186 24.924,41.481 24.924,41.189 25.363,40.75 28.15,40.75 28.9,41.5 28.9,45.874 FB3.1@28.9,46.55
NetC32_2: C32.2 C33.1 U2.A27 U2.G31 | length 8.9
  Top Layer w0.15: C32.2@24.953,20.385 C32.2@25.032,20.306
  Top Layer w0.2: U2.A27@24.46,19.064 24.46,19.64 24.801,19.98 C32.2@24.801,20.381 ; C32.2@24.803,20.535 24.953,20.385 C32.2@24.953,20.34 ; C32.2@25.032,20.306 v1(25.512,20.306) ; U2.G31@25.46,17.664 27.185,17.664 27.409,17.889 27.409,18.056 27.444,18.091 C33.1@27.459,18.091 27.494,18.056 27.618,18.056 v1@27.884,17.79
  Bottom Layer w0.2: v1(25.512,20.306) 25.512,19.719 27.441,17.79 v1(27.885,17.79)
NetC39_2: C39.2 U2.A15 | length 2.8
  Top Layer w0.225: U2.A15@22.06,19.064 22.06,19.42 22.286,19.646 22.286,21.619 C39.2@22.151,21.754
NetC42_1: C42.1 R40.1 U2.A5 U2.E1 | length 7.9
  Top Layer w0.15: C42.1@17,21.184 C42.1@17.231,20.952 ; C42.1@17.226,20.947 17.866,20.306 19.231,20.306 v1(19.275,20.35) 19.347,20.35 20.06,19.637 U2.A5@20.06,19.064
  Top Layer w0.2: v1@18.577,18.152 18.966,18.152 19.054,18.064 U2.E1@19.06,18.064
  Top Layer w0.25: R40.1@16.394,21.184 C42.1@17,21.184
  Bottom Layer w0.2: v1(18.575,18.15) 18.575,19.65 v1(19.275,20.35)
NetC43_1: C43.1 U2.B6 | length 3.7
  Top Layer w0.15: C43.1@18.527,20.825 19.472,20.825 19.75,20.547 19.75,20.475 20.235,19.99 20.391,19.834 20.391,18.938 ; U2.B6@20.26,18.664 20.391,18.934
  Top Layer w0.187: C43.1@18.4,20.952 C43.1@18.552,20.8